# EAGLE board Neat Snicket-Gaaris (EAGLE 9.7.0)

Size 248.3 x 230.16 mm. Coordinates in mm from the lower left corner, seen from the top.
Outline: 0,0 248.3,0 248.3,230.16 0,230.16 0,0
Copper layers (1*16): Top 0.035mm / dielectric 1.5mm / Bottom 0.035mm
Design rules "default": minimum track width 6mil, minimum drill 0.35mm, track to track 6mil, track to pad 6mil, pad to pad 6mil, via to via 6mil, smd to smd 6mil, copper to edge 40mil, drill to drill 6mil, minimum pad ring 10mil, minimum via ring 8mil, stop-mask expansion 4mil, vias tented up to drill 0mil, thermal gap 10mil

## Footprints (pad centres in the part's own frame; a part is rotated, then mirrored left to right if it is on the bottom)
BATTERY-GENERIC = drill 1.118 pad 3.15 octagon: + 2.54,0; - -2.54,0
1X02 = drill 1.016 long: 1 -1.27,0; 2 1.27,0
RESAD1016W63L850D250B = drill 0.83 pad 1.43: 1 -5.08,0; 2 5.08,0
SWITCH-MOMENTARY-PTH-6.5MM = drill 1.016 pad 1.88: 1 -3.251,2.261; 2 3.251,2.261; 3 -3.251,-2.261; 4 3.251,-2.261
TO220BV = drill 1.016 long: D 0,-2.54; G -2.54,-2.54; S 2.54,-2.54
ARDUINO-UNO-R3-SHIELD = drill 1.016 pad 1.88: 3.3V 24.13,-2.54; 5V 24.13,0; A0 24.13,12.7; A1 24.13,15.24; A2 24.13,17.78; A3 24.13,20.32; A4 24.13,22.86; A5 24.13,25.4; AREF -24.13,-13.97; D2 -24.13,20.32; D3 -24.13,17.78; D4 -24.13,15.24; D5 -24.13,12.7; D6 -24.13,10.16; D7 -24.13,7.62; D8 -24.13,3.81; D9 -24.13,1.27; D10 -24.13,-1.27; D11 -24.13,-3.81; D12 -24.13,-6.35; D13 -24.13,-8.89; GND@0 24.13,2.54; GND@1 24.13,5.08; GND@2 -24.13,-11.43; IOREF 24.13,-7.62; NC 24.13,-10.16; RES 24.13,-5.08; RX -24.13,25.4; SCL -24.13,-19.05; SDA -24.13,-16.51; TX -24.13,22.86; VIN 24.13,7.62
JHD-162A = drill 1.016 long: 1 -19.05,0; 2 -16.51,0; 3 -13.97,0; 4 -11.43,0; 5 -8.89,0; 6 -6.35,0; 7 -3.81,0; 8 -1.27,0; 9 1.27,0; 10 3.81,0; 11 6.35,0; 12 8.89,0; 13 11.43,0; 14 13.97,0; 15 16.51,0; 16 19.05,0
TO92 = drill 0.813 octagon: 1 -1.27,0; 2 0,1.905; 3 1.27,0

## Placement (x,y rotation side)
BAT1  3V  [BATTERY-GENERIC]  230.05,214.87 270 top
L1  LIGHTBULB  [1X02]  76.7,213.3 0 top
P1  BATTERYGENERIC  [BATTERY-GENERIC]  154.42,221.91 180 top
R1  1k  [RESAD1016W63L850D250B]  88.71,26.75 90 top
R2  1k  [RESAD1016W63L850D250B]  88.71,8.97 90 top
R3  1k  [RESAD1016W63L850D250B]  73.31,27.13 90 top
R4  1k  [RESAD1016W63L850D250B]  73.31,9.35 90 top
R5  1k  [RESAD1016W63L850D250B]  98.95,26.98 90 top
R6  1k  [RESAD1016W63L850D250B]  98.95,9.2 90 top
R7  1k  [RESAD1016W63L850D250B]  58.67,26.86 90 top
R8  1k  [RESAD1016W63L850D250B]  58.67,9.08 90 top
RRESISTOR  10k  [RESAD1016W63L850D250B]  146.53,174.53 90 top
S6  SWITCH_MOMENTARY  [SWITCH-MOMENTARY-PTH-6.5MM]  61.21,17.97 90 top
S7  SWITCH_MOMENTARY  [SWITCH-MOMENTARY-PTH-6.5MM]  75.85,18.24 90 top
S8  SWITCH_MOMENTARY  [SWITCH-MOMENTARY-PTH-6.5MM]  91.25,17.86 90 top
S9  SWITCH_MOMENTARY  [SWITCH-MOMENTARY-PTH-6.5MM]  101.49,18.09 90 top
T1  NMOSFET  [TO220BV]  132.58,209.13 0 top
U3  ARDUINO-UNO-R3-SHIELD  [ARDUINO-UNO-R3-SHIELD]  47.88,158.77 270 top
U5  LCD-16X2JHD-162A  [JHD-162A]  127.58,106.06 0 top
UTEMP_SENSOR  TMP36GT9Z_TO92  [TO92]  242.2,215.7 0 top

## Library data of the parts
BAT1 L1 P1 R1-R8 RRESISTOR S6-S9 U3 U5 UTEMP_SENSOR = Tinkercad
T1 = Tinkercad; CATEGORY: Transistor; SUB-CATEGORY: MOSFET; TYPE: N-Channel

## Nets
BAT1+: BAT1.+ UTEMP_SENSOR.3
BAT1-: BAT1.- P1.- R2.1 R4.1 R6.1 R8.1 T1.S U3.GND@0 U3.GND@1 U3.GND@2 U5.1 U5.3 U5.5 U5.16 UTEMP_SENSOR.1
L1_1: L1.1 T1.D
P1+: L1.2 P1.+
S6_2: R7.1 R8.2 S6.1 S6.2
S7_2: R3.1 R4.2 S7.1 S7.2
S8_2: R1.1 R2.2 S8.1 S8.2
S9_2: R5.1 R6.2 S9.1 S9.2
U3_5V: RRESISTOR.2 S6.3 S7.3 S8.3 S9.3 U3.5V U5.2
U3_A0: U3.A0 UTEMP_SENSOR.2
U3_D2: U3.D2 U5.14
U3_D3: U3.D3 U5.13
U3_D4: U3.D4 U5.12
U3_D5: U3.D5 U5.11
U3_D6: R7.2 U3.D6
U3_D7: R3.2 U3.D7
U3_D8: R1.2 U3.D8
U3_D9: R5.2 U3.D9
U3_D10: T1.G U3.D10
U3_D11: U3.D11 U5.6
U3_D12: U3.D12 U5.4
U5_LED+: RRESISTOR.1 U5.15

## Tracks (layer width: path | path; a pad name or v marks a point on that pad's centre or on a via)
BAT1+  (1 unrouted)
BAT1-  (14 unrouted)
L1_1  (1 unrouted)
P1+  (1 unrouted)
S6_2  (3 unrouted)
S7_2  (3 unrouted)
S8_2  (3 unrouted)
S9_2  (3 unrouted)
U3_5V  (6 unrouted)
U3_A0  (1 unrouted)
U3_D2  (1 unrouted)
U3_D3  (1 unrouted)
U3_D4  (1 unrouted)
U3_D5  (1 unrouted)
U3_D6  (1 unrouted)
U3_D7  (1 unrouted)
U3_D8  (1 unrouted)
U3_D9  (1 unrouted)
U3_D10  (1 unrouted)
U3_D11  (1 unrouted)
U3_D12  (1 unrouted)
U5_LED+  (1 unrouted)